# Altium PCB Sound_Sensor.PcbDoc (part 3 of 6)
Units mm, origin at the board's own origin, x right, y up, seen from the top; angles counter-clockwise.
Board outline 90.25 x 88.01 mm, 2 copper layers (Top Layer, Bottom Layer), stack 1.448 mm thick; 369 components, 272 nets, 1045 pads, 508 vias.
Unrouted connection lines stored in the file: 15.
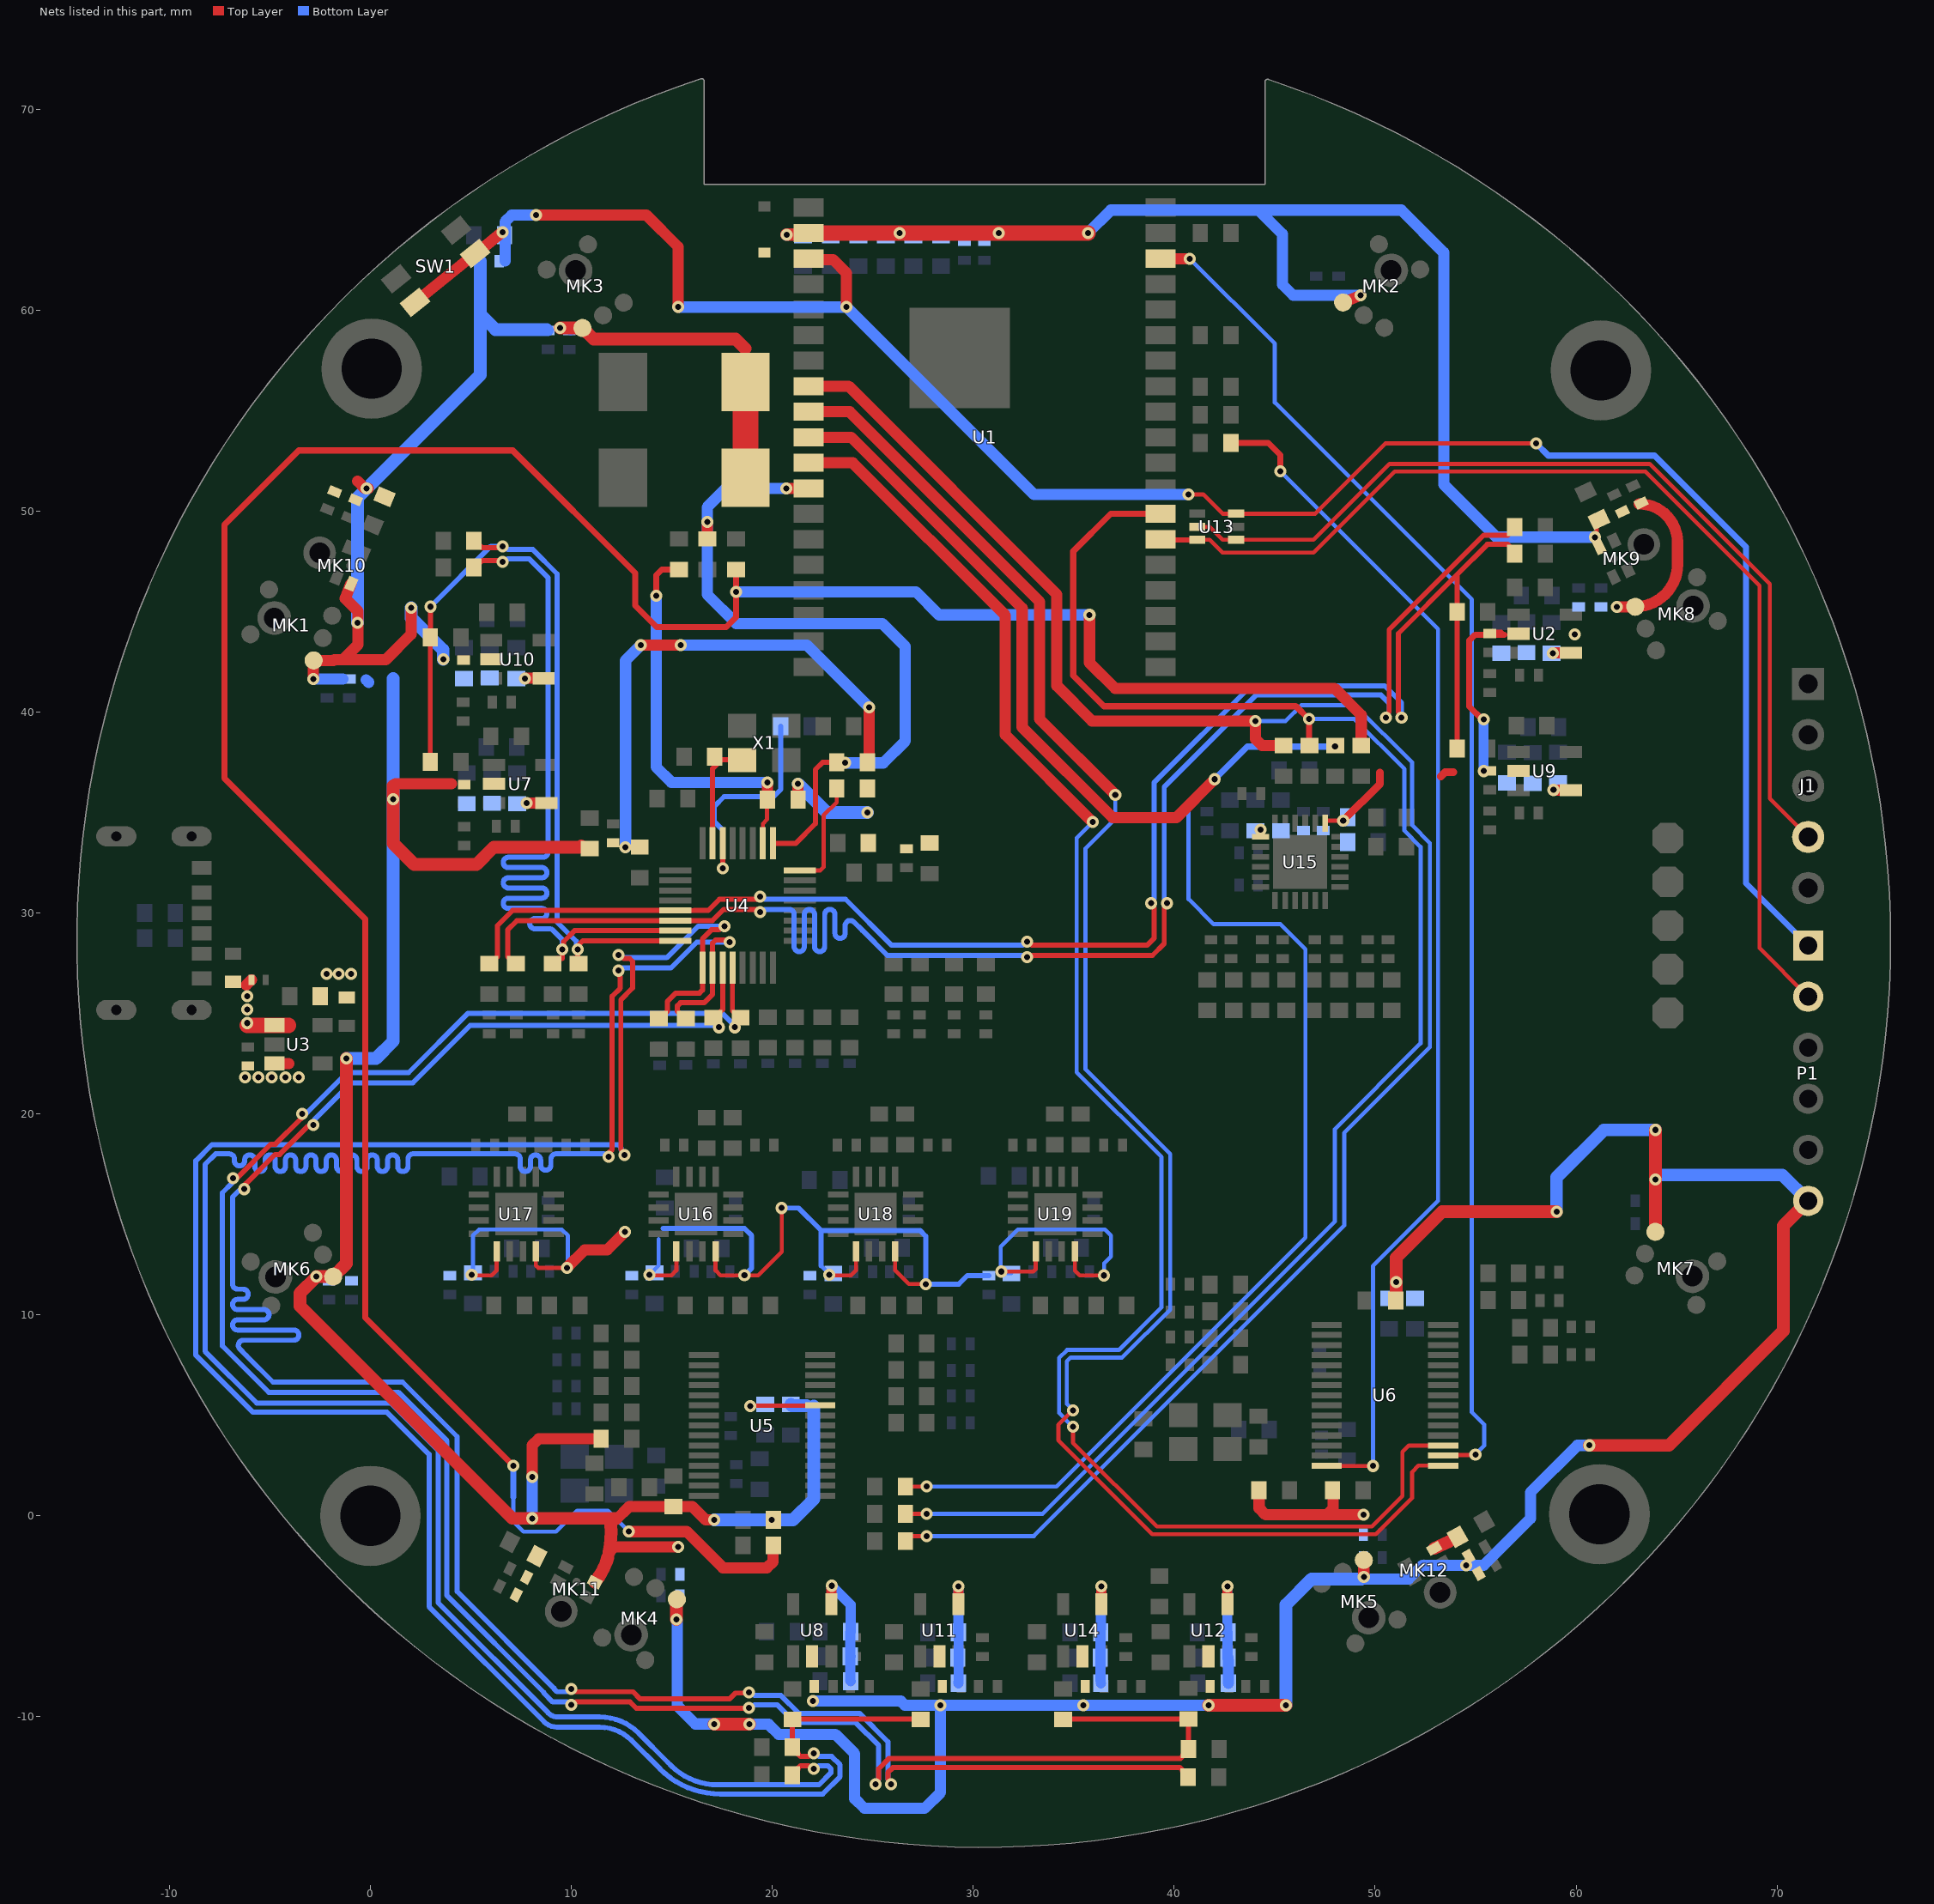
[diagram p2: the nets of this part, all layers, seen from the top]

## Part data (continued)
R44 R45 R46 R47: library part RC0603FR-0711K3L, "RES 11.3K OHM 1% 1/10W 0603", Case Code (Imperial)=0603, Case Code (Metric)=1608, LCSC Part Number=C137803, Manufacturer=Yageo, Max Operating Temperature=155°C, Max Power Dissipation=100mW, Min Operating Temperature=-55°C, Package Quantity=1, Resistance=11.3kR, Resistor Type="Thick Film", Temperature Coefficient=100ppm/°C, Tolerance=1%, Voltage Rating=50V, Working Voltage=75V, Case/Package=0603, Category="Chip SMD Resistors", ComponentLink1Description=https://datasheet.ciiva.com/2454/pyu-r-int-thick-7-2454634.pdf?src-supplier=Digi-Key, ComponentLink1URL=https://datasheet.ciiva.com/2454/pyu-r-int-thick-7-2454634.pdf?src-supplier=Digi-Key, ComponentLink2Description=https://datasheet.ciiva.com/2454/pyu-r-int-thick-7-2454635.pdf?src-supplier=Digi-Key, ComponentLink2URL=https://datasheet.ciiva.com/2454/pyu-r-int-thick-7-2454635.pdf?src-supplier=Digi-Key, ComponentLink3Description=https://datasheet.ciiva.com/2454/pyu-r-int-thick-7-2454633.pdf?src-supplier=Digi-Key, ComponentLink3URL=https://datasheet.ciiva.com/2454/pyu-r-int-thick-7-2454633.pdf?src-supplier=Digi-Key, ComponentLink4Description=https://datasheet.ciiva.com/12558/rc0603-272842-12558680.pdf?src-supplier=Mouser, ComponentLink4URL=https://datasheet.ciiva.com/12558/rc0603-272842-12558680.pdf?src-supplier=Mouser, ComponentLink5Description=https://datasheet.ciiva.com/15189/getdatasheetpartid-326472-15189596.pdf?src-supplier=Verical, ComponentLink5URL=https://datasheet.ciiva.com/15189/getdatasheetpartid-326472-15189596.pdf?src-supplier=Verical, Construction=Rectangular, Depth=0.8mm, Features="Moisture Resistant", Height=0.022inch, Item Type=Resistor, Lead Free="Lead Free", Length=1.6mm, Manufacturer Part Number=RC0603FR-0711K3L, Military Standard=Not, Number of Terminations=2, Packaging="Tape and Reel", Power Rating=100mW, Pricing 1="1=0.05080, 10=0.01610, 25=0.01080 (USD)", RoHS=Yes, RoHS Compliant=Yes, Series=RC, Stock 1=26, Supplier 1="Arrow Electronics", Supplier Part Number 1=RC0603FR-0711K3L, Technology="THICK FILM", Termination=SMD/SMT, Voltage Rating (DC)=50V, Width=0.8mm
SB1 SB2 SB3 SB4 SB5 SB6 SB7 SB8 SB9 SB10 SB11 SB12 SB13 SB14 SB15 SB16 SB17 SB18 SB19 SB20 SB21 SB22 SB23 SB24 SB25 SB26 SB27 SB28 SB29 SB30 SB31 SB32 SB33 SB34 SB35 SB36 SB37 SB38 SB39 SB40 SB41 SB42 SB43 SB44 SB45 SB46 SB47 SB48 SB49 SB50 SB51 SB52 SB53 SB54 SB55 SB56 SB57 SB58 SB59 SB60 SB61 SB62 SB63 SB64 SB65 SB66 SB67 SB68 SB69 SB70 SB71 SB72 SB73 SB74 SB75 SB76 SB77 SB78 SB79 SB80 SB81 SB82 SB83 SB84 SB85 SB86 SB87 SB88 SB89 SB90 SB91 SB92 SB93 SB94 SB95 SB96 SB97 SB98 SB99 SB100 SB101 SB102 SB103 SB104 SB105 SB106: "Solder Bridge ON"
SW1: "3mm 2mm Round Button 50mA Top3.65mm SPST 12V SMD Tactile Switches", Manufacturer=XKB, Package=Custom, ComponentLink1Description=LCSC, ComponentLink1URL=https://lcsc.com/product-detail/Tactile-Switches_XKB-Connectivity-TS-1185EC-C-D-B_C318893.html, Manufacturer Part No=TS-1185EC-C-D-B
U1: "RF TXRX MOD WIFI PCB TRACE SMD", LCSC Part Number=C2973667, Manufacturer="Espressif Systems", Supplier Part Number 1=1965-ESP32-WROVER-E-N8R8CT-ND, Category=Uncategorized, ComponentLink1Description=LCSC, ComponentLink1URL=https://www.lcsc.com/product-detail/WiFi-Modules_Espressif-Systems-ESP32-WROVER-E-N8R8_C2973667.html, Item Type=Module, Manufacturer Part Number=ESP32-WROVER-E-N8R8, Pricing 1="1=3.60000 (USD)", RoHS=No, Stock 1=16752, Supplier 1=Digi-Key
U2 U7 U8 U9 U10 U11 U12 U14: "IC OPAMP GP 1 CIRCUIT SOT23-5", Case/Package=SOT-23, Input Bias Current=10pA, Input Offset Voltage (Vos)=1mV, LCSC Part Number=C131974, Manufacturer="Texas Instruments", Max Operating Temperature=85°C, Max Supply Voltage=5.5V, Min Operating Temperature=-40°C, Min Supply Voltage=2.7V, Nominal Supply Current=250uA, Output Current per Channel=15mA, Package Quantity=250, Power Supply Rejection Ratio (PSRR)=90.46dB, Quiescent Current=250mA, Supplier Part Number 1=OPA344NACT-ND, Voltage Gain=122dB, Bandwidth=1MHz, Common Mode Rejection Ratio=76dB, ComponentLink1Description=http://www.ti.com/general/docs/lit/getliterature.tsp?genericPartNumber=OPA344&fileType=pdf&src-supplier=Newark, ComponentLink1URL=http://www.ti.com/general/docs/lit/getliterature.tsp?genericPartNumber=OPA344&fileType=pdf&src-supplier=Newark, ComponentLink2Description=http://www.farnell.com/datasheets/1882856.pdf?src-supplier=Element14, ComponentLink2URL=http://www.farnell.com/datasheets/1882856.pdf?src-supplier=Element14, ComponentLink3Description=http://www.ti.com/lit/ds/symlink/opa344.pdf?src-supplier=Digi-Key, ComponentLink3URL=http://www.ti.com/lit/ds/symlink/opa344.pdf?src-supplier=Digi-Key, ComponentLink4Description=http://focus.ti.com/lit/ds/symlink/opa344.pdf?src-supplier=Avnet+Europe, ComponentLink4URL=http://focus.ti.com/lit/ds/symlink/opa344.pdf?src-supplier=Avnet+Europe, ComponentLink5Description=http://www.ti.com/general/docs/lit/getliterature.tsp?genericPartNumber=OPA4345&&fileType=pdf&src-supplier=Avnet, ComponentLink5URL=http://www.ti.com/general/docs/lit/getliterature.tsp?genericPartNumber=OPA4345&&fileType=pdf&src-supplier=Avnet, Gain Bandwidth Product=1MHz, Height=1.15mm, Item Type=IC, Lead Free="Lead Free", Length=2.9mm, Manufacturer Part Number=OPA344NA/250, Max I/O Voltage=1mV, Number of Amplifiers=1, Number of Channels=1, Number of Circuits=1, Number of Elements=1, Number of Pins=5, Packaging="Tape and Reel", Pricing 1="1=1.59, 10=1.43, 25=1.3492, 100=1.0794 (USD)", Radiation Hardening=No, REACH SVHC="No SVHC", Slew Rate=0.8V/µs, Stock 1=6132, Supplier 1=Digi-Key, Unity Gain Bandwidth Product=1MHz, Width=1.6mm
U3: "Linear Voltage Regulator IC Positive Fixed 1 Output 3.3V 1A SOT-25", Case/Package=SOT-25, Dropout Voltage=655mV, Manufacturer=Torex, Max Input Voltage=6V, Max Operating Temperature=85°C, Min Current Limit=1.005A, Min Input Voltage=1.6V, Min Operating Temperature=-40°C, Nominal Output Voltage=3.3V, Output Current=1A, Package Quantity=1, Supplier Part Number 1=84R0738, Category="Voltage Regulators - Linear", ComponentLink1Description=https://datasheet.ciiva.com/7992/610888-7992813.pdf?src-supplier=Element14, ComponentLink1URL=https://datasheet.ciiva.com/7992/610888-7992813.pdf?src-supplier=Element14, ComponentLink2Description=https://datasheet.ciiva.com/5755/610888-5755886.pdf?src-supplier=Farnell, ComponentLink2URL=https://datasheet.ciiva.com/5755/610888-5755886.pdf?src-supplier=Farnell, ComponentLink3Description=https://datasheet.ciiva.com/2040/xc6220-2040201.pdf?src-supplier=Digi-Key, ComponentLink3URL=https://datasheet.ciiva.com/2040/xc6220-2040201.pdf?src-supplier=Digi-Key, ComponentLink4Description=https://datasheet.ciiva.com/2040/xc6220-2040200.pdf?src-supplier=Digi-Key, ComponentLink4URL=https://datasheet.ciiva.com/2040/xc6220-2040200.pdf?src-supplier=Digi-Key, ComponentLink5Description=https://datasheet.ciiva.com/2040/xc6220-2040202.pdf?src-supplier=Digi-Key, ComponentLink5URL=https://datasheet.ciiva.com/2040/xc6220-2040202.pdf?src-supplier=Digi-Key, Manufacturer Part Number=XC6220B331MR-G, Mount="Surface Mount", Number of Pins=5, Number of Regulators=1, Output Type=Fixed, Output Voltage=3.3V, Packaging="Tape and Reel", Pricing 1="1=1.20000, 10=1.08000, 100=0.83900, 500=0.69300, 1000=0.54800 (USD)", REACH SVHC="No SVHC", RoHS=Yes, RoHS Compliant=Yes, Series=-, Stock 1=3078, Supplier 1=Newark
U4: "IC ADC 24BIT SIGMA-DELTA 32TQFP", Manufacturer="Texas Instruments", Supplier Part Number 1=595-ADS131M08IPBSR, Category="Analog to Digital Converters (ADCs)", Manufacturer Part Number=ADS131M08IPBSR, Pricing 1="1=8.85000, 10=7.99000, 50=7.62000, 100=6.62000, 1000=5.39000, 10000=5.39000 (USD)", RoHS=Yes, Supplier 1=Mouser
U5 U6: "IC ADC/AUDIO 24BIT 192K 30TSSOP", Case/Package=TSSOP, Manufacturer="Texas Instruments", Max Operating Temperature=125°C, Max Supply Voltage=3.6V, Min Operating Temperature=-40°C, Min Supply Voltage=3V, Operating Supply Current=31mA, Operating Supply Voltage=3.3V, Package Quantity=2000, Power Consumption=145mW, Supplier Part Number 1=595-PCM1865DBTR, Category="Amplifiers - Audio", ComponentLink1Description=https://datasheet.ciiva.com/48474/pcm1861-48474798.pdf?src-supplier=Avnet, ComponentLink1URL=https://datasheet.ciiva.com/48474/pcm1861-48474798.pdf?src-supplier=Avnet, ComponentLink2Description=https://datasheet.ciiva.com/29699/pcm1861-29699238.pdf?src-supplier=Digi-Key, ComponentLink2URL=https://datasheet.ciiva.com/29699/pcm1861-29699238.pdf?src-supplier=Digi-Key, Contact Plating=Gold, Interface=I2C,SPI,Serial, Lead Free="Lead Free", Manufacturer Part Number=PCM1865DBTR, Mount="Surface Mount", Number of A/D Converters=4, Number of ADC Channels=4, Number of Analog Inputs=8, Number of DAC Channels=0, Number of Pins=30, Packaging="Tape and Reel", Pricing 1="1=10.72000, 10=9.69000, 25=9.23000, 50=9.23000, 100=8.02000, 250=7.66000, 500=6.98000, 1000=6.54000, 10000=6.54000 (USD)", Resolution=24b, RoHS=Yes, RoHS Compliant=Yes, Sampling Rate=192KS/s, Supplier 1=Mouser, Supply Type=Single, Weight=0.003439oz
U13: "2 NPN pre-biased (Dual) 150mW 100mA 50V SC-70-6(SOT-363) Digital Transistors ROHS", Manufacturer=Changjiang, Package=SC-70-6(SOT-363), ComponentLink1Description=LCSC, ComponentLink1URL=https://www.lcsc.com/product-detail/Digital-Transistors_Changjiang-Electronics-Tech-CJ-UMH3N_C62892.html, Manufacturer Part No=UMH3N
U15: "IC ADC AUDIO 768K 24WQFN", LCSC Part Number=C1852018, Manufacturer="Texas Instruments", Supplier Part Number 1=296-TLV320ADC5140IRTWTCT-ND, ComponentLink1Description=http://www.ti.com/general/docs/suppproductinfo.tsp?distId=10&amp;gotoUrl=http%3A%2F%2Fwww.ti.com%2Flit%2Fgpn%2Ftlv320adc5140&src-supplier=Digi-Key, ComponentLink1URL=http://www.ti.com/general/docs/suppproductinfo.tsp?distId=10&amp;gotoUrl=http%3A%2F%2Fwww.ti.com%2Flit%2Fgpn%2Ftlv320adc5140&src-supplier=Digi-Key, Item Type=IC, Manufacturer Part Number=TLV320ADC5140IRTWT, Pricing 1="1=6.07000, 10=5.44900, 25=5.15160, 100=4.46470 (USD)", RoHS=Yes, RoHS Compliant=Yes, Stock 1=40, Supplier 1=Digi-Key
U16 U17 U18 U19: "IC AMP CLASS AB STEREO 16TQFN", Manufacturer=Maxim, Max Operating Temperature=85°C, Max Supply Voltage=5.5V, Min Operating Temperature=-40°C, Min Supply Voltage=2.4V, Package Quantity=2500, Power Supply Rejection Ratio (PSRR)=95dB, Supplier Part Number 1=700-MAX4063ETET, Voltage Gain=26.02dB, Category="Amplifiers - Audio", ComponentLink1Description=https://datasheet.ciiva.com/1792/max4063-1792007.pdf?src-supplier=Digi-Key, ComponentLink1URL=https://datasheet.ciiva.com/1792/max4063-1792007.pdf?src-supplier=Digi-Key, ComponentLink2Description=https://datasheet.ciiva.com/2968/max4063-2968783.pdf?src-supplier=Avnet, ComponentLink2URL=https://datasheet.ciiva.com/2968/max4063-2968783.pdf?src-supplier=Avnet, Item Type=IC, Manufacturer Part Number=MAX4063ETE+T, Mount="Surface Mount", Number of Pins=16, Packaging="Tape and Reel", Pricing 1="1=1.88000, 10=1.70000, 50=1.60000, 100=1.37000, 1000=0.96000, 10000=0.92700 (USD)", Radiation Hardening=No, RoHS=Yes, RoHS Compliant=Yes, Series=-, Stock 1=23845, Supplier 1=Mouser
X1: "8.192MHz SMD Crystal Resonator 12pF 150Ω ±10ppm ±30ppm -40℃~+85℃ SMD_3225_4P Crystals ROHS", Manufacturer=JYJE, Package=Custom, Manufacturer Part No=3TJ481920NYLBC
X2 X3: "24.576MHz SMD Crystal Resonator 12pF 60Ω ±10ppm -40℃~+85℃ SMD3225-4P Crystals ROHS", Manufacturer=JGHC, ComponentLink1Description=LCSC, ComponentLink1URL=https://lcsc.com/product-detail/Crystals_JGHC-S3224576121060_C390772.html, Manufacturer Part Number=S3224576121060

## Free pads (board coordinates)
  round 5 hole 3: MH1(0.068,57.075) MH2(0,0) MH3(61.163,0.08) MH4(61.232,56.995)

## Via types
v1: diameter 0.6, hole 0.3, Top Layer to Bottom Layer, 508 vias

## Nets (pads, with @x,y where several pads share a name; then routed paths per layer and width w, separated by ;. In a path a pad name is that pad's centre, name@x,y a point inside that pad or via, vN(x,y) a via of type N, cw(c..) or ccw(c..) an arc to the next point about the centre after c; other vN are vias at no path point)
3V3: C2.1 C3.1 C4.1 C5.1 C6.1 C7.1 C8.1 C9.1 C10.1 C11.1 C12.1 C13.1 C14.1 C15.1 C16.1 C17.1 C18.1 C19.1 C21.1 C27.1 C29.1 C31.1 C33.1 C34.1 C35.1 C37.1 C38.1 C39.1 C40.1 C41.1 C42.1 C56.1 C57.1 C58.1 C59.1 C75.1 C76.1 C77.1 C78.1 C79.1 C80.1 C81.1 C82.1 C83.1 C84.1 C85.1 C86.1 C96.1 C97.1 C119.2 C121.2 C122.2 C124.2 C129.1 C130.1 C131.1 C132.1 C133.1 C134.1 D1.1 FB2.2 MK1.5 MK2.5 MK3.5 MK4.5 MK5.5 MK6.5 MK7.5 MK8.5 MK9.5 MK10.5 MK11.5 MK12.5 P1.6 R1.1 R2.1 R3.1 R15.2 R16.2 R17.2 R18.2 R28.2 R29.2 R30.2 R36.2 R40.2 R42.2 R43.2 SB8.1 SB9.1 SB26.1 SB27.1 SB28.1 SB70.1 SB71.1 SB72.1 U1.2 U2.2 U5.25 U7.2 U8.2 U9.2 U10.2 U11.2 U12.2 U14.2 U15.1 U15.19 U16.1 U16.4 U17.1 U17.4 U18.1 U18.4 U19.1 U19.4 | length 488
  Top Layer w0.203: v1@5.051,11.963 6.042,11.963 6.288,12.209 U17.1@6.288,13.153 ; U17.4@8.238,13.153 8.238,12.459 8.357,12.34 v1(9.783,12.34) ; v1(13.891,11.989) 13.891,11.963 14.983,11.963 15.229,12.209 U16.1@15.229,13.153 ; U16.4@17.179,13.153 17.179,12.209 17.424,11.963 v1(18.618,11.963) 19.304,11.963 20.472,13.132 v1(20.472,15.316) ; v1(18.898,5.461) 18.916,5.479 22.377,5.479 U5.25@22.395,5.497 ; v1@22.73,11.963 23.924,11.963 24.169,12.209 U18.1@24.169,13.153 ; U18.4@26.119,13.153 26.119,12.209 26.797,11.532 v1(27.635,11.532) ; v1@31.369,12.154 v1(31.394,12.154) 32.991,12.154 33.11,12.273 U19.1@33.11,13.151 ; U19.4@35.06,13.151 35.06,12.208 35.306,11.962 v1(36.5,11.962) ; U15.1@44.296,33.789 v1(44.296,34.136) ; U15.19@47.521,34.464 47.521,34.556 47.559,34.595 v1(48.412,34.595) ; R15.2@55.689,43.891 R15.2@55.702,43.904 ; R15.2@55.689,43.993 56.28,43.993 56.433,43.84 ; v1@61.02,48.773 61.02,49.463 C34.1@61.136,49.579 C34.1@61.161,49.604
  Top Layer w0.305: C19.1@18.644,56.719 18.669,56.695 C19.1@18.671,56.693 ; v1@35.433,-9.347 v1@35.484,-9.398 ; v1(55.397,39.624) 55.338,39.624 54.686,40.275 54.686,43.554 54.972,43.84 56.433,43.84
  Top Layer w0.381: v1(48.412,34.595) 50.241,36.424 50.241,36.982 ; 53.277,36.792 53.493,37.008 53.892,37.008
  Top Layer w0.559: v1(-2.845,41.631) MK1.5@-2.845,42.421 ; MK1.5@-2.819,42.565 -1.829,42.565 -1.798,42.596 -1.372,42.596 ; -1.245,45.644 MK10.5@-0.965,46.38 ; -1.237,45.636 -0.61,45.009 -0.61,43.358 -1.372,42.596 ; -0.633,51.484 -0.265,51.116 v1(-0.184,51.116) v1@-0.103,51.116 ; 1.143,36.324 1.245,36.425 4.045,36.425 ; v1(2.032,45.187) 2.032,43.866 0.762,42.596 -1.372,42.596 ; v1(8.052,1.93) 8.052,3.508 8.379,3.835 SB26.1@11.481,3.835 ; v1(9.783,12.34) 10.674,13.231 11.784,13.231 12.661,14.109 12.661,14.117 v1@12.656,14.122 ; 10.382,33.273 10.484,33.376 C31.1@10.66,33.199 ; 11.824,-2.036 cw(c12.311,-2.036) 11.876,-1.816 cw(c12.311,-2.036) 12.311,-1.549 v1(15.316,-1.549) ; 12.243,-0.178 12.878,0.457 SB27.1@15.088,0.457 16.027,0.457 16.68,-0.195 17.112,-0.195 v1(17.12,-0.203) ; v1(13.467,43.332) v1(15.45,43.332) ; R2.1@21.285,35.636 v1(21.285,36.424) ; R3.1@24.732,37.492 24.816,37.576 v1(24.816,40.234) ; U14.2@35.431,-6.997 U14.2@35.439,-7.005 ; v1@35.777,63.805 v1@35.789,63.805 ; SB72.1@44.221,1.27 44.221,1.108 44.224,1.105 44.224,0.378 44.552,0.051 47.601,0.051 ; SB71.1@47.879,1.27 47.903,1.246 47.903,0.353 47.601,0.051 ; MK2.5@48.407,60.375 v1(49.276,60.731) ; v1(49.428,0.051) 47.601,0.051 ; v1(49.438,-3.039) MK5.5@49.438,-2.199 ; SB70.1@51.029,10.719 SB70.1@51.046,10.736 ; v1@51.046,11.625 v1(51.054,11.633) ; v1(62.029,45.235) MK8.5@62.943,45.235 ccw(c62.943,47.342) 65.049,47.342 65.049,48.445 ccw(c63.143,48.445) C37.1@63.143,50.35
  Top Layer w0.635: v1(-1.194,22.758) -1.194,12.552 MK6.5@-1.845,11.902 v1(-2.678,11.902) -3.505,11.074 -3.505,10.439 7.061,-0.127 v1(8.052,-0.127) 11.927,-0.127 ; v1@1.135,35.643 1.135,33.46 2.184,32.41 5.283,32.41 6.146,33.273 10.382,33.273 ; v1(1.143,35.662) 1.143,36.324 ; v1@9.45,59.107 MK3.5@10.557,59.107 ; MK3.5@10.557,59.107 11.117,58.547 18.186,58.547 18.644,58.089 ; MK11.5@11.173,-3.305 ccw(c8.603,-1.187) 11.824,-2.036 ; 11.876,-1.816 ccw(c7.267,-0.832) 11.927,-0.127 ; 12.243,-0.127 11.927,-0.127 ; v1(15.24,-5.156) 15.24,-4.169 MK4.5@15.255,-4.154 ; v1(17.12,-10.363) v1(18.872,-10.363) ; 18.656,54.788 C19.1@18.656,56.413 ; 18.669,54.801 C19.1@18.669,56.695 ; v1(20.726,63.754) 21.742,63.754 U1.2@21.819,63.83 ; v1(41.707,-9.423) v1(45.568,-9.423) ; SB70.1@51.046,10.736 v1@51.046,11.625 ; v1(51.054,11.633) 51.054,12.852 53.34,15.138 v1(59.03,15.138) ; MK12.5@52.938,-1.62 53.682,-1.279 ; v1(60.655,3.505) 64.618,3.505 70.307,9.195 70.307,14.427 P1.6@71.552,15.672 ; MK7.5@63.947,14.133 v1(63.947,16.728) v1(63.947,19.202)
  Top Layer w0.762: U1.2@21.819,63.83 v1(26.34,63.83) v1(31.267,63.83) v1(35.712,63.83)
  Top Layer w1.27: C21.1@18.671,51.943 C19.1@18.671,56.413 C19.1@18.671,56.693
  Bottom Layer w0.203: C129.1@5.105,12.09 5.105,13.945 5.41,14.249 9.525,14.249 9.83,13.945 9.83,12.387 v1(9.783,12.34) ; v1(13.891,11.989) 13.894,11.989 14.351,12.446 14.351,13.767 ; C58.1@20.88,5.497 C58.1@20.922,5.539 ; 22.428,12.446 22.831,12.043 v1(22.831,11.989) ; C132.1@31.902,12.065 31.458,12.065 31.369,12.154 31.369,13.384 32.233,14.248 36.551,14.248 36.855,13.943 36.855,12.902 36.52,12.567 v1@36.52,11.982
  Bottom Layer w0.254: 14.58,14.3 18.618,14.3 18.974,13.945 18.974,12.319 v1(18.618,11.963) ; v1(20.472,15.316) 21.311,15.316 22.428,14.199 ; 22.428,12.446 22.428,14.199 ; C134.1@30.785,11.951 29.705,11.951 29.286,11.532 v1(27.635,11.532) 27.635,13.919 27.356,14.199 22.428,14.199
  Bottom Layer w0.508: v1(55.397,37.059) v1(55.397,39.624)
  Bottom Layer w0.559: v1(-2.845,41.631) -2.837,41.638 C4.1@-1.359,41.638 ; -0.203,41.597 -0.084,41.478 ; v1(-0.184,51.116) v1@-0.176,51.124 ; v1@3.624,42.629 v1(3.632,42.621) ; v1(8.052,-0.127) v1(8.052,1.93) ; C8.1@8.801,59.03 8.839,58.992 C8.1@8.839,58.979 ; C7.1@9.919,59.092 C7.1@9.982,59.03 ; v1(12.7,33.274) 12.7,42.566 v1(13.467,43.332) ; v1(15.24,-5.156) 15.278,-5.194 15.278,-9.461 16.172,-10.355 17.112,-10.355 v1(17.12,-10.363) ; v1(15.45,43.332) 21.717,43.332 v1(24.816,40.234) ; v1@18.898,-10.363 18.905,-10.371 19.815,-10.371 20.315,-10.871 23.139,-10.871 24.105,-11.836 24.105,-14.072 24.587,-14.554 27.584,-14.554 28.372,-13.767 v1(28.372,-9.423) ; v1@21.285,36.412 v1@21.296,36.412 ; v1(22.022,-9.22) 26.391,-9.22 26.594,-9.423 v1(28.372,-9.423) ; v1(35.712,63.83) 36.855,64.973 44.196,64.973 ; v1(41.707,-9.423) v1(35.484,-9.423) v1(28.372,-9.423) ; v1(49.276,60.731) 45.923,60.731 45.39,61.265 45.39,63.779 44.196,64.973 ; v1@49.327,-3.15 v1(49.438,-3.039) 49.549,-3.15 51.664,-3.15 52.349,-2.464 v1(54.534,-2.464) 55.397,-2.464 57.734,-0.127 57.734,1.168 60.071,3.505 v1(60.655,3.505) ; v1@60.933,48.697 56.038,48.697 53.416,51.319 53.416,62.865 51.308,64.973 44.196,64.973 ; v1(63.947,16.728) 63.947,16.924 v1@63.983,16.96
  Bottom Layer w0.635: v1(-1.194,22.758) 0.279,22.758 1.143,23.622 v1(1.143,35.662) 1.143,41.656 ; v1(-0.635,44.44) -0.635,50.665 v1(-0.184,51.116) ; v1@-0.176,51.124 5.474,56.773 5.474,59.779 ; v1(2.032,45.187) 2.032,44.677 3.624,43.085 v1@3.624,42.629 ; R17.2@5.474,62.433 5.474,59.779 ; C8.1@8.788,59.03 6.223,59.03 5.474,59.779 ; v1(17.12,-0.203) v1(19.964,-0.203) 21.031,-0.203 22.071,0.837 22.071,5.461 ; C58.1@20.922,5.539 20.985,5.475 21.699,5.475 ; v1@21.296,36.412 22.708,35.001 v1(24.74,35.001) ; v1(45.568,-9.423) 45.568,-4.42 46.838,-3.15 v1@49.327,-3.15 ; v1(59.03,15.138) 59.03,16.84 61.392,19.202 v1(63.947,19.202) ; v1@63.983,16.96 70.264,16.96 P1.6@71.552,15.672
  other v1: 5.051,11.989 12.675,14.122 -2.175,26.975 -1.57,26.975 -0.965,26.975 59.944,43.866 60.944,48.697 9.449,59.106
5V: C#2.1 D2.2 FB1.2 U3.1 U3.3 | length 3.1
  Top Layer w0.559: -6.172,26.41 D2.2@-5.913,26.67 ; U3.3@-4.775,22.509 -4.061,22.509
  Top Layer w0.762: v1@-6.121,24.409 U3.1@-4.775,24.409 -4.061,24.409
  other v1: -6.236,21.81 -5.568,21.81 -4.899,21.81 -4.231,21.81 -3.562,21.81 -6.121,24.52 -6.121,25.189 -6.121,25.857
\C\S: R3.2 SB5.2 U1.12 U4.17 | length 36.5
  Top Layer w0.254: U4.17@20.03,33.467 21.174,33.467 22.149,34.442 22.149,37.135 22.506,37.492 R3.2@23.208,37.492
  Top Layer w0.559: SB5.2@16.764,48.616 v1(16.764,49.454) ; v1(20.701,51.13) U1.12@21.819,51.13 ; R3.2@23.208,37.492 23.24,37.492 23.267,37.465 v1(23.622,37.465)
  Bottom Layer w0.559: v1(16.764,49.454) 16.764,45.847 18.212,44.399 25.476,44.399 26.619,43.256 26.619,38.557 25.527,37.465 v1(23.622,37.465) ; v1@16.764,49.465 16.764,50.19 17.704,51.13 v1(20.701,51.13) v1@20.693,51.122
\D\R\D\Y\: R2.2 SB49.1 U4.18 | length 19.7
  Top Layer w0.203: U4.18@19.53,33.467 19.531,33.468 19.531,34.441 19.736,34.646 R2.2@19.736,35.509
  Top Layer w0.305: v1(14.224,45.777) 14.224,46.812 14.503,47.092 SB49.1@15.367,47.092
  Top Layer w0.559: R2.2@19.761,35.636 v1(19.761,36.5)
  Bottom Layer w0.559: v1(14.224,45.777) 14.224,37.262 14.986,36.5 v1(19.761,36.5)
\R\E\S\E\T\: R1.2 U4.16 | length 5.5
  Top Layer w0.203: U4.16@21.38,32.117 22.389,32.117 22.555,32.283 22.555,34.849 23.208,35.501 R1.2@23.208,36.197
  Top Layer w0.559: R1.2@23.224,36.213 R1.2@23.259,36.177
ADC1_XIN: R7.2 U4.22 | length 11.3
  Top Layer w0.254: v1(17.53,32.228) U4.22@17.53,33.467
  Bottom Layer w0.254: v1(17.53,32.228) 17.53,34.133 17.12,34.544 17.12,35.306 17.602,35.789 20.066,35.789 20.422,36.144 R7.2@20.422,39.294
ADC1_XOUT#: C44.2 U4.23 X1.3 | length 4.9
  Top Layer w0.203: U4.23@17.03,33.467 U4.23@17.033,33.47
  Top Layer w0.254: U4.23@17.033,33.47 17.033,37.185 17.478,37.63 X1.3@17.983,37.63
ADC_I2S.BCKA: SB76.1 SB78.2 U1.26 | length 83.1
  Top Layer w0.203: SB76.1@26.627,0.097 v1(27.678,0.097)
  Top Layer w0.305: U1.26@39.319,49.86 36.841,49.86 34.976,47.995 34.976,41.808 36.5,40.284 46.059,40.284 46.694,39.649 v1(46.711,39.649) 46.72,39.64 46.72,38.338 SB78.2@46.73,38.329
  Bottom Layer w0.203: v1(27.678,0.097) 33.447,0.097 47.996,14.646 47.996,19.243 52.263,23.511 52.263,33.284 51.46,34.087 51.46,36.322 51.46,36.551 51.46,37.16 48.971,39.649 v1(46.711,39.649)
ADC_I2S.BCKB: U1.36 U6.17 | length 68.8
  Top Layer w0.203: U6.17@53.387,2.996 53.413,3.022 54.965,3.022 v1(54.991,3.048)
  Top Layer w0.559: U1.36@39.319,62.56 39.325,62.554 40.776,62.554 v1(40.783,62.548)
  Bottom Layer w0.203: v1(40.783,62.548) 45.009,58.322 45.009,55.397 54.813,45.593 54.813,5.156 55.423,4.547 55.423,3.48 v1(54.991,3.048)
ADC_I2S.DOUT1: SB73.2 SB79.2 U1.10 | length 91.8
  Top Layer w0.203: SB73.2@26.627,1.456 v1(27.678,1.456)
  Top Layer w0.559: U1.10@21.819,53.67 23.927,53.67 32.436,45.161 32.436,39.243 36.932,34.747 40.107,34.747 40.118,34.747 42.012,36.641 v1(42.012,36.652) ; v1(48.006,38.278) 48.006,38.316 SB79.2@48.019,38.329
  Bottom Layer w0.203: v1(27.678,1.456) 34.146,1.456 46.533,13.843 46.533,28.194 45.288,29.439 41.961,29.439 40.716,30.683 40.716,35.331 42.037,36.652 v1(42.012,36.652)
  Bottom Layer w0.305: v1(42.012,36.652) 43.637,38.278 v1(48.006,38.278)
ADC_I2S.DOUT2: U1.11 U6.18 | length 85
  Top Layer w0.203: v1(34.966,4.429) 34.966,3.642 39.141,-0.533 49.835,-0.533 51.359,0.991 51.359,3.175 51.68,3.496 U6.18@53.387,3.496
  Top Layer w0.559: U1.11@21.819,52.4 24.003,52.4 31.598,44.806 31.598,38.862 v1(35.941,34.519)
  Bottom Layer w0.203: v1(34.966,4.429) 34.276,5.12 34.276,7.86 34.671,8.255 37.252,8.255 39.37,10.373 39.37,17.856 35.154,22.073 35.154,33.731 v1(35.941,34.519)
ADC_I2S.LRCKA: SB75.1 SB77.1 U1.8 | length 97
  Top Layer w0.203: SB75.1@26.627,-1.262 26.873,-1.016 v1(27.678,-1.016)
  Top Layer w0.559: U1.8@21.819,56.21 23.8,56.21 34.163,45.847 34.163,41.3 35.916,39.548 v1(44.044,39.548) 44.044,38.656 44.371,38.329 SB77.1@45.441,38.329
  Bottom Layer w0.203: v1@27.678,-1.008 33.02,-1.008 48.463,14.435 48.463,19.05 52.73,23.317 52.73,33.477 51.841,34.366 51.841,37.49 48.997,40.335 46.33,40.335 45.542,39.548 v1(44.044,39.548)
ADC_I2S.LRCKB: U1.9 U6.16 | length 88.4
  Top Layer w0.203: v1(34.966,5.248) 34.239,4.521 34.239,3.759 38.913,-0.914 50.038,-0.914 51.841,0.889 51.841,2.184 52.153,2.496 U6.16@53.387,2.496
  Top Layer w0.559: U1.9@21.819,54.94 23.851,54.94 33.299,45.491 33.299,39.649 v1(37.071,35.877)
  Bottom Layer w0.203: v1(34.966,5.248) 34.966,5.256 34.657,5.566 34.657,7.682 34.849,7.874 37.414,7.874 39.802,10.262 39.802,18.01 35.585,22.226 35.585,33.198 37.071,34.684 v1(37.071,35.877)
ADC_I2S.SCKA: SB7.1 SB74.1 SB80.1 | length 142
  Top Layer w0.305: v1(7.112,2.489) -0.254,9.855 -0.254,29.693 -7.264,36.703 -7.264,49.301 -3.556,53.01 7.087,53.01 13.183,46.914 13.183,45.288 14.249,44.221 17.704,44.221 18.199,44.717 v1(18.199,45.974) SB7.1@18.199,47.092
  Top Layer w0.559: v1(12.867,-0.787) 15.748,-0.787 17.551,-2.591 19.71,-2.591 ; 19.736,-2.591 20.041,-2.286 SB74.1@20.041,-1.524 ; SB74.1@19.964,-1.575 SB74.1@20.066,-1.473 ; v1(35.789,44.831) 35.789,42.443 37.059,41.173 47.981,41.173 49.308,39.846 SB80.1@49.308,38.329
  Bottom Layer w0.203: 7.112,0.94 7.112,-0.279 7.62,-0.787 9.246,-0.787 10.287,0.254 11.825,0.254 v1(12.867,-0.787)
  Bottom Layer w0.305: 7.112,0.94 v1(7.112,2.489)
  Bottom Layer w0.559: v1(18.199,45.974) 27.153,45.974 28.296,44.831 v1(35.789,44.831)
ADC_I2S.SCKB: SB6.2 U6.15 | length 59.9
  Top Layer w0.203: U6.15@47.587,2.496 47.603,2.48 v1(49.895,2.48)
  Top Layer w0.305: SB6.2@42.824,53.391 44.679,53.391 45.288,52.781 v1(45.288,51.968)
  Bottom Layer w0.203: v1(45.288,51.968) 53.133,44.123 53.133,15.668 49.895,12.43 v1(49.895,2.48)
ADS_Pins.AIN0_N: SB23.2 SB55.2 U4.30 | length 79.5
  Top Layer w0.254: SB23.2@7.239,27.483 7.175,27.483 6.833,27.826 6.833,29.159 7.291,29.617 U4.30@15.18,29.617 16.107,29.617 16.111,29.613 17.022,29.613 17.584,30.175 19.271,30.175 v1(19.406,30.04) ; v1@32.69,27.746 32.783,27.746 32.918,27.881 38.92,27.881 39.505,28.466 v1@39.505,30.251 ; 50.698,39.993 50.698,44.094 55.397,48.793 56.604,48.793 56.947,49.136 SB55.2@56.947,49.2
  Bottom Layer w0.254: v1(19.406,30.04) 19.499,30.04 19.634,30.175 20.199,30.175 20.834,30.175 cw(c20.834,29.921) 21.088,29.921 21.088,28.331 ccw(c21.342,28.331) 21.596,28.331 21.596,29.921 cw(c21.85,29.921) 22.104,29.921 22.104,28.331 ccw(c22.358,28.331) 22.612,28.331 22.612,29.921 cw(c22.866,29.921) 23.12,29.921 23.12,28.989 ccw(c23.374,28.989) 23.628,28.989 23.628,29.371 cw(c23.882,29.371) 24.062,29.55 24.486,29.127 25.731,27.881 v1@32.461,27.881 ; v1(39.64,30.48) 39.64,30.574 39.505,30.709 39.505,36.272 44.076,40.843 50.292,40.843 50.698,40.437 50.698,39.993 50.538,39.833 v1(50.538,39.726)
  other v1: 32.69,27.797
ADS_Pins.AIN0_P: SB22.2 SB54.2 SB62.2 SB63.2 U4.29 | length 79.7
  Top Layer w0.254: SB22.2@5.918,27.483 5.982,27.483 6.325,27.826 6.325,29.37 7.08,30.125 U4.29@15.172,30.125 ; U4.29@15.18,30.117 16.107,30.117 16.111,30.121 16.812,30.121 17.374,30.683 19.271,30.683 v1(19.406,30.818) ; v1@32.69,28.524 32.783,28.524 32.918,28.389 38.651,28.389 38.997,28.735 v1@38.997,30.251 ; 51.156,39.993 51.156,43.905 54.077,46.826 ; SB63.2@54.077,38.176 SB62.2@54.077,44.983 54.077,46.826 ; SB54.2@56.947,47.93 56.947,47.993 56.604,48.336 55.587,48.336 54.077,46.826
  Bottom Layer w0.254: v1(19.406,30.818) 19.499,30.818 19.634,30.683 23.647,30.683 25.941,28.389 v1@32.461,28.389 ; v1(38.862,30.48) 38.862,30.574 38.997,30.709 38.997,36.482 43.815,41.3 50.481,41.3 51.316,40.466 v1(51.316,39.726)
  other v1: 32.69,28.575
ADS_Pins.AIN1_N: SB24.2 SB57.2 U4.31 | length 43.5
  Top Layer w0.254: SB57.2@5.156,47.193 5.156,47.257 5.347,47.447 5.481,47.447 5.57,47.536 6.352,47.536 6.382,47.507 6.537,47.507 v1(6.579,47.465) ; SB24.2@9.068,27.483 SB24.2@9.323,27.738 ; 9.551,27.738 v1(9.551,28.178) 9.614,28.241 9.614,28.571 10.161,29.117 U4.31@15.18,29.117
  Bottom Layer w0.254: v1(6.579,47.465) 6.686,47.465 6.846,47.625 7.899,47.625 8.839,46.685 8.839,33.655 8.839,33.02 cw(c8.585,33.02) 8.585,32.766 6.868,32.766 ccw(c6.868,32.512) 6.868,32.258 8.534,32.258 cw(c8.534,32.004) 8.534,31.75 6.868,31.75 ccw(c6.868,31.496) 6.868,31.242 8.534,31.242 cw(c8.534,30.988) 8.534,30.734 6.868,30.734 ccw(c6.868,30.48) 6.868,30.226 8.534,30.226 cw(c8.534,29.972) 8.534,29.718 8.187,29.718 ccw(c8.187,29.464) 8.187,29.21 8.912,29.21 cw(c8.912,28.956) 9.091,29.136 9.558,28.669 9.558,28.219 9.558,28.185 v1(9.551,28.178)
ADS_Pins.AIN1_P: SB25.2 SB56.2 SB64.2 SB65.2 U4.32 | length 42.5
  Top Layer w0.254: SB64.2@2.984,37.516 SB65.2@2.984,43.712 2.997,43.725 v1(2.997,45.237) ; SB56.2@5.156,48.514 5.156,48.451 5.347,48.26 5.481,48.26 5.57,48.171 6.352,48.171 6.382,48.201 6.537,48.201 v1(6.579,48.242) ; SB25.2@10.101,27.745 SB25.2@10.363,27.483 ; SB25.2@10.329,27.745 v1(10.329,28.178) 10.405,28.254 10.405,28.445 10.577,28.617 U4.32@15.18,28.617
  Bottom Layer w0.254: v1(2.997,45.237) 6.002,48.242 6.686,48.242 6.846,48.082 8.089,48.082 9.296,46.875 9.296,29.542 10.253,28.585 10.253,28.499 10.263,28.489 10.263,28.244 v1(10.329,28.178)
ADS_Pins.AIN2_N: SB11.2 SB59.2 U4.2 | length 111.3
  Top Layer w0.254: v1(11.862,17.861) 11.928,17.927 11.928,18.118 12.035,18.224 12.035,25.855 12.438,26.258 12.438,26.805 12.411,26.833 12.411,27.061 v1(12.344,27.127) ; SB11.2@15.708,24.74 15.645,24.74 15.284,25.101 15.284,25.378 15.432,25.527 16.613,25.527 17.034,25.948 17.034,27.263 U4.2@17.03,27.267 17.03,28.194 17.034,28.198 17.034,28.502 17.183,28.651 17.686,28.651 17.788,28.55 v1(17.882,28.55) ; SB59.2@21.006,-12.903 21.285,-12.624 21.285,-12.552 21.404,-12.433 21.805,-12.433
  Bottom Layer w0.254: v1(11.862,17.861) 11.768,17.861 11.621,18.009 11.581,18.009 9.238,18.009 ccw(c9.238,17.755) 8.984,17.755 8.984,17.453 cw(c8.73,17.453) 8.476,17.453 8.476,17.704 ccw(c8.222,17.704) 7.968,17.704 7.968,17.384 cw(c7.714,17.384) 7.46,17.384 7.46,17.755 ccw(c7.206,17.755) 7.206,18.009 2.126,18.009 ccw(c2.126,17.755) 1.872,17.755 1.872,17.384 cw(c1.618,17.384) 1.364,17.384 1.364,17.704 ccw(c1.11,17.704) 0.856,17.704 0.856,17.384 cw(c0.602,17.384) 0.348,17.384 0.348,17.704 ccw(c0.094,17.704) -0.16,17.704 -0.16,17.384 cw(c-0.414,17.384) -0.668,17.384 -0.668,17.704 ccw(c-0.922,17.704) -1.176,17.704 -1.176,17.384 cw(c-1.43,17.384) -1.684,17.384 -1.684,17.704 ccw(c-1.938,17.704) -2.192,17.704 -2.192,17.384 cw(c-2.446,17.384) -2.7,17.384 -2.7,17.704 ccw(c-2.954,17.704) -3.208,17.704 -3.208,17.384 cw(c-3.462,17.384) -3.716,17.384 -3.716,17.704 ccw(c-3.97,17.704) -4.224,17.704 -4.224,17.384 cw(c-4.478,17.384) -4.732,17.384 -4.732,17.704 ccw(c-4.986,17.704) -5.24,17.704 -5.24,17.384 cw(c-5.494,17.384) -5.748,17.384 -5.748,17.704 ccw(c-6.002,17.704) -6.256,17.704 -6.256,17.665 cw(c-6.51,17.665) -6.764,17.665 -6.764,17.755 ccw(c-7.018,17.755) -7.018,18.009 -7.653,18.009 -7.696,18.009 -8.223,17.482 -8.223,8.183 -5.653,5.613 1.016,5.613 3.378,3.251 3.378,-4.332 8.851,-9.804 ccw(c9.341,-9.314) 9.341,-10.008 11.416,-10.008 cw(c11.416,-12.739) 13.348,-10.808 14.808,-12.268 14.963,-12.423 ; v1(12.344,27.127) 12.438,27.127 12.573,27.262 14.961,27.262 16.248,28.55 v1(17.882,28.55) ; 14.964,-12.424 ccw(c17.284,-10.106) 17.284,-13.386 17.287,-13.386 22.323,-13.386 22.916,-12.793 22.916,-12.582 22.768,-12.433 22.327,-12.433 22.166,-12.594 v1(22.073,-12.594)
ADS_Pins.AIN2_P: SB10.2 SB58.2 SB66.2 SB67.2 U4.1 | length 111.5
  Top Layer w0.254: v1(12.344,27.905) 12.438,27.905 12.611,27.732 12.907,27.732 13.055,27.583 13.055,26.265 12.467,25.676 12.467,18.224 12.64,18.051 v1(12.64,17.958) ; SB10.2@14.351,24.74 14.414,24.74 14.776,25.101 14.776,25.589 15.197,26.01 16.377,26.01 16.526,26.158 16.526,27.263 U4.1@16.53,27.267 16.53,28.194 16.526,28.198 16.526,28.713 16.973,29.159 17.353,29.159 17.531,29.337 v1(17.624,29.337) ; SB66.2@21.006,-10.135 SB58.2@21.006,-11.506 21.285,-11.786 21.285,-11.857 21.404,-11.976 21.805,-11.976 ; SB66.2@21.006,-10.109 SB67.2@27.356,-10.109
  Bottom Layer w0.254: v1(12.344,27.905) 12.438,27.905 12.573,27.77 14.75,27.77 16.317,29.337 v1(17.624,29.337) ; 12.479,18.212 12.479,18.317 12.331,18.466 -7.886,18.466 -8.68,17.671 -8.68,7.994 -5.842,5.156 0.827,5.156 2.921,3.062 2.921,-4.521 8.661,-10.262 ccw(c9.275,-9.648) 9.275,-10.516 11.416,-10.516 cw(c11.416,-12.739) 12.988,-11.167 14.425,-12.603 ; 14.425,-12.604 ccw(c17.411,-9.627) 17.415,-13.843 22.513,-13.843 23.374,-12.982 23.374,-12.393 22.957,-11.976 22.327,-11.976 22.166,-11.816 v1(22.073,-11.816)
ADS_Pins.AIN3_N: SB12.2 SB61.2 U4.3 | length 111.2
  Top Layer w0.254: v1(-6.274,16.256) -6.208,16.322 -6.208,16.513 -4.738,17.982 -4.51,17.982 -3.102,19.39 -2.911,19.39 v1(-2.845,19.456) ; v1@10.236,-8.755 13.073,-8.755 13.429,-9.111 17.875,-9.111 18.166,-8.82 18.807,-8.82 v1(18.847,-8.78) ; v1(17.355,24.308) 17.355,24.511 17.075,24.79 17.129,24.79 17.53,25.192 U4.3@17.53,27.267 ; 25.756,-13.093 25.756,-12.776 26.002,-12.53 40.292,-12.53 40.411,-12.649 40.411,-12.725 SB61.2@40.691,-13.005
  Bottom Layer w0.254: v1@-6.531,16.19 -6.854,15.866 -6.854,14.224 -6.854,11.532 ccw(c-6.6,11.532) -6.6,11.278 -6.332,11.278 cw(c-6.332,11.024) -6.332,10.77 -6.6,10.77 ccw(c-6.6,10.516) -6.6,10.262 -5.297,10.262 cw(c-5.297,10.008) -5.297,9.754 -6.6,9.754 ccw(c-6.6,9.5) -6.6,9.246 -3.81,9.246 cw(c-3.81,8.992) -3.81,8.738 -6.314,8.738 ccw(c-6.314,8.484) -6.493,8.304 -6.165,7.976 -4.844,6.655 1.607,6.655 4.318,3.944 4.318,-3.759 9.138,-8.58 9.138,-8.606 9.287,-8.755 9.779,-8.755 9.914,-8.62 v1(10.008,-8.62) ; v1(-2.845,19.456) -2.779,19.523 -2.779,19.713 -0.945,21.547 2.116,21.547 4.97,24.401 17.261,24.401 v1(17.355,24.308) ; 19.114,-8.941 20.433,-8.941 21.322,-9.83 24.345,-9.83 25.756,-11.241 25.756,-13.132 25.916,-13.292 v1(25.916,-13.36)
ADS_Pins.AIN3_P: SB13.2 SB60.2 SB68.2 SB69.2 U4.4 | length 111.5
  Top Layer w0.254: v1(-6.824,16.806) -6.758,16.872 -6.567,16.872 -4.949,18.49 -4.72,18.49 -3.461,19.749 -3.461,19.94 v1(-3.395,20.006) ; v1@10.236,-9.263 12.923,-9.263 13.236,-9.576 18.829,-9.576 v1(18.847,-9.558) ; U4.4@18.03,27.267 18.021,27.258 18.021,25.128 18.359,24.79 18.412,24.79 18.133,24.511 v1(18.133,24.308) ; 25.298,-13.093 25.298,-12.587 25.813,-12.072 40.318,-12.072 40.437,-11.953 40.437,-11.887 SB60.2@40.716,-11.608 ; SB69.2@34.29,-10.109 SB68.2@40.589,-10.109 ; SB60.2@40.716,-11.481 SB68.2@40.716,-10.109
  Bottom Layer w0.254: v1@-6.89,16.549 -7.362,16.077 -7.362,8.455 -5.055,6.147 1.397,6.147 3.81,3.734 3.81,-3.97 8.63,-8.79 8.63,-8.817 9.077,-9.263 9.779,-9.263 9.914,-9.398 v1(10.008,-9.398) ; v1(-3.395,20.006) -3.329,20.073 -3.138,20.073 -1.155,22.055 1.906,22.055 4.844,24.994 17.524,24.994 18.133,24.385 v1(18.133,24.308) ; 19.114,-9.398 20.244,-9.398 21.133,-10.287 24.155,-10.287 25.298,-11.43 25.298,-13.132 25.138,-13.292 v1(25.138,-13.36)
"DEBUG SIG.ENABLE": C20.1 P1.1 R17.1 SW1.1 U1.3 U13.6 | length 105.6
  Top Layer w0.203: v1(40.716,50.825) 41.453,50.825 42.413,49.865 U13.6@43.088,49.865 47.02,49.865 50.521,53.365 v1(58.014,53.365)
  Top Layer w0.559: SW1.1@2.227,60.385 2.496,60.602 SW1.1@4.951,62.59 ; SW1.1@5.219,62.808 5.501,63.009 v1(6.579,63.881) ; v1(8.255,64.719) 13.741,64.719 15.316,63.144 v1(15.316,60.147) ; U1.3@21.819,62.56 21.875,62.504 23.03,62.504 23.698,61.836 v1(23.698,60.147)
  Bottom Layer w0.305: v1(58.014,53.365) 58.623,52.756 63.906,52.756 68.453,48.209 68.453,31.471 P1.1@71.552,28.372
  Bottom Layer w0.559: 6.706,62.433 6.706,64.392 7.033,64.719 v1(8.255,64.719) ; v1(15.316,60.147) v1(23.698,60.147) 33.02,50.825 v1(40.716,50.825)
"DEBUG SIG.IO_0": P1.2 U1.25 U13.3 | length 55.6
  Top Layer w0.203: U13.3@41.148,48.565 41.768,48.565 42.403,47.93 46.939,47.93 50.971,51.962 63.456,51.962 69.132,46.285 69.132,28.251 P1.2@71.552,25.832
  Top Layer w0.254: U1.25@39.319,48.59 39.344,48.565 U13.3@41.148,48.565
DTR: J1.4 U13.2 U13.4 | length 46.2
  Top Layer w0.203: U13.2@41.148,49.215 41.768,49.215 42.418,48.565 U13.4@43.088,48.565 46.939,48.565 50.717,52.343 63.659,52.343 69.64,46.362 69.64,35.694 J1.4@71.552,33.782
FB1_1: C87.1 R4.2 R10.1 U2.4 | length 0.9
  Top Layer w0.559: v1(58.852,42.926) 58.86,42.934 59.729,42.934 U2.4@59.738,42.943
FB1_2: C109.1 R22.2 R25.1 U9.4 | length 0.9
  Top Layer w0.559: v1(58.877,36.119) 58.882,36.114 59.733,36.114 U9.4@59.738,36.11
FB2_1: C88.1 R5.2 R13.1 U7.4 | length 1
  Top Layer w0.559: v1(7.772,35.458) 7.78,35.466 8.751,35.466 U7.4@8.76,35.475
FB2_2: C110.1 R23.2 R26.1 U10.4 | length 0.9
  Top Layer w0.559: v1@7.722,41.681 7.727,41.676 U10.4@8.625,41.676
  other v1: 7.696,41.667
FB3_1: C89.1 R6.2 R14.1 U8.4 | length 6.1
  Top Layer w0.508: U8.4@22.934,-4.397 22.948,-4.383 22.948,-3.494 v1(22.962,-3.48)
  Bottom Layer w0.508: v1(22.962,-3.48) 23.901,-4.42 R14.1@23.901,-5.766 23.889,-5.779 23.889,-6.985 23.901,-6.998 23.889,-7.01 23.889,-8.217 R6.2@23.901,-8.23
FB3_2: C111.1 R24.2 R27.1 U11.4 | length 5.7
  Top Layer w0.508: U11.4@29.261,-4.389 v1(29.261,-3.505)
  Bottom Layer w0.508: R24.2@29.261,-8.331 29.273,-8.141 R27.1@29.273,-5.779 ; R27.1@29.261,-5.791 v1(29.261,-3.505)
FB4_1: C115.1 R34.2 R35.1 U12.4 | length 5.7
  Top Layer w0.508: v1(42.647,-3.505) 42.647,-4.389 U12.4@42.655,-4.397
  Bottom Layer w0.508: R35.1@42.647,-5.791 v1(42.647,-3.505) ; C115.1@42.659,-7.023 R35.1@42.659,-5.804
  Bottom Layer w0.559: C115.1@42.672,-7.061 42.694,-7.226 42.694,-8.166 R34.2@42.697,-8.331
FB4_2: C117.1 R38.2 R39.1 U14.4 | length 5.7
  Top Layer w0.508: U14.4@36.373,-4.389 v1(36.373,-3.505)
  Bottom Layer w0.508: R39.1@36.335,-5.626 36.335,-8.141 R38.2@36.347,-8.331 ; R39.1@36.347,-5.613 36.373,-3.53 v1(36.373,-3.505)